# Altium PCB fligt_control_card.PcbDoc (part 2 of 3)
Units mil, origin at the board's own origin, x right, y up, seen from the top; angles counter-clockwise.
Board outline 2510.03 x 2930.03 mil, 4 copper layers (Top Layer, LY_1, LY_2, Bottom Layer), stack 62.677 mil thick; 107 components, 79 nets, 361 pads, 454 vias.
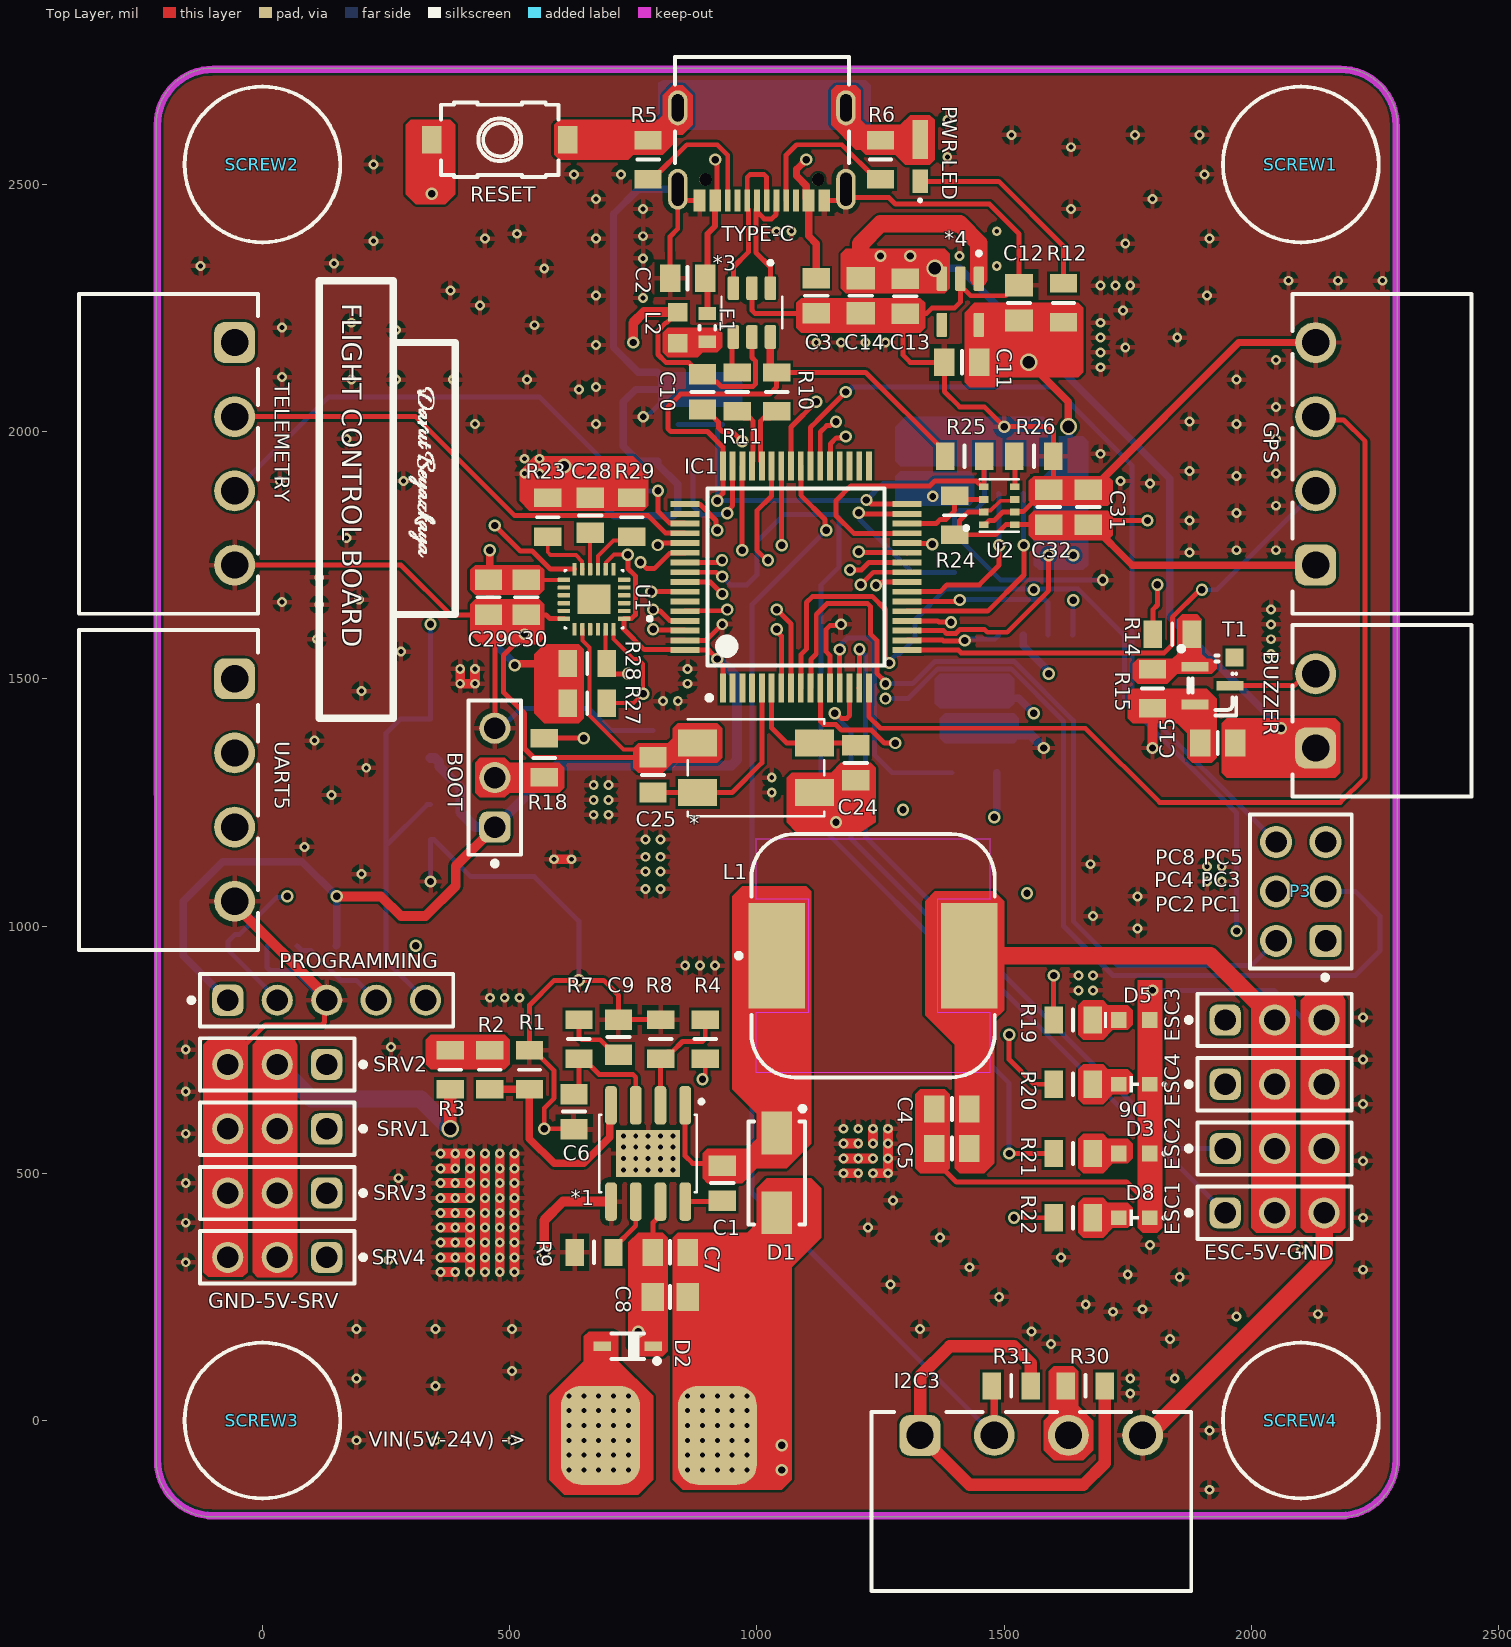
[diagram p0: Top Layer view]

## Via types
v1: diameter 20, hole 10, Top Layer to Bottom Layer, tented both sides, 351 vias
v2: diameter 25, hole 15, Top Layer to Bottom Layer, tented both sides, 89 vias
v3: diameter 23.62, hole 13.78, Top Layer to Bottom Layer, tented both sides, 8 vias
v4: diameter 35, hole 25, Top Layer to Bottom Layer, tented both sides, 4 vias
v5: diameter 25, hole 15, Top Layer to LY_2, tented both sides, 1 vias
v6: diameter 30, hole 20, Top Layer to Bottom Layer, tented both sides, 1 vias

## Nets (pads, with @x,y where several pads share a name; then routed paths per layer and width w, separated by ;. In a path a pad name is that pad's centre, name@x,y a point inside that pad or via, vN(x,y) a via of type N, cw(c..) or ccw(c..) an arc to the next point about the centre after c; other vN are vias at no path point) (continued)
+3.3V_DC: (continued)
  Top Layer w15: C29.2@457.01,1700.2 460,1703.19 v2(460,1760) ; v2(510,1527.5) 512.7,1527.5 515.2,1530 616.93,1530 R28.1@617.64,1530.71 ; R10.1@1027.4,2131.97 *3.6@1027.4,2191.18 ; v4(1550,2140) 1630,2060 v4(1630,2010) ; C31.2@1676.89,1811.61 1758.5,1730 GPS.1@2130,1730
  Top Layer w20: v2(150,1060) 240,1060 280,1020 330,1020 391.02,1081.03 391.02,1121.03 BOOT.1@470,1200
  Top Layer w25: R31.2@1553.74,70 1553.74,116.26 1520,150 1390,150 1330,90 I2C3.1@1330,-30 1430,-130 1660,-130 1703.74,-86.26 R30.2@1703.74,70
  LY_1 w10: v2(460,1760) 505,1805 796.82,1805 822.08,1779.74 822.08,1745.86 816.22,1740 791.82,1740 771.82,1760 751.98,1760 743.02,1751.04 v2(738.96,1751.04)
  LY_1 w15: v2(1480,1220) 1535,1275 1535,1416.11 1532.5,1418.61 1532.5,1441.39 1535,1443.89 1535,1455 v2(1590,1510)
  LY_1 w25: TELEMETRY.1@-56.14,2180 -59.34,2176.8 -120.34,2176.8 -170,2127.14 -170,1870.5 -118.66,1819.16 -118.66,1562.52 UART5.1@-56.14,1500 -59.34,1496.81 -120.34,1496.81 -170,1447.14 -170,1198.57 -132.52,1161.09 -132.52,912.52 PROGRAMMING.1@-70,850 -131,850 -187.5,793.5 -187.5,313.46 -114.04,240 995.96,240 1265.8,-29.84 1329.84,-29.84 I2C3.1@1330,-30
  LY_2 w10: v2(738.96,1751.04) 739.31,1751.04 848.27,1860 v2(920,1860) ; v3(1355.63,1868.93) 1741.07,1868.93 v3(1790,1820)
  LY_2 w15: v2(1560,1430) 1560,1480 v2(1590,1510) 1590,1421.11 1552.5,1383.61 1552.5,1348.61 2031.11,870 2221.21,870 2230,878.79 2230,1630 GPS.1@2130,1730 1660,1730 v2(1640,1750)
  Bottom Layer w10: C21.2@840,2014.57 C16.2@930,2014.57 920,2004.57 v2(920,1860) 920.76,1860.76 1220.76,1860.76 v2(1221.52,1861.53) 1254.57,1894.57 C18.2@1320,1894.57
  Bottom Layer w15: PROGRAMMING.1@-70,850 -160,940 -160,1050 -80,1130 80,1130 v2(150,1060) 150,961.26 R16.1@148.74,960 ; v2(460,1760) 460,1580 510,1530 v2(510,1527.5) ; v2(1480,1220) 1480,1224.06 1485.08,1229.14 L3.1@1485.08,1310 ; C22.2@1480,1475.43 1495.14,1460.3 1529.7,1460.3 v2(1560,1430) ; *5.3@1538.34,1588.39 1538.34,1567.13 1588.35,1517.12 1588.35,1511.65 v2(1590,1510) ; *5.7@1588.34,1875 *5.7@1589.17,1874.17 ; v4(1630,2010) 1631.91,2008.09 1631.91,1963.52 C33.2@1635.43,1960 ; *5.8@1638.34,1875 *5.8@1639.17,1874.17
  Bottom Layer w20: R13.2@340,1340 348.86,1340 357.56,1331.3 357.56,1322.44 400,1280 400,1230 429.36,1200.64 469.36,1200.64 BOOT.1@470,1200 594.57,1324.57 C17.2@790,1324.57 948.28,1324.57 960,1336.28 960,1503.62 937.08,1526.54 934.81,1526.54 921.35,1540 v2(920,1540)
+5V_DC: *3.5 *4.1 *4.3 BUZZER.1 C4.2 C5.2 C10.1 C13.2 C14.2 C15.2 ESC1.2 ESC2.2 ESC3.2 ESC4.2 L1.2 L2.2 R3.2 SRV1.2 SRV2.2 SRV3.2 SRV4.2 | length 6865.4
  Top Layer w10: L2.2@840,2241.5 839.01,2241.5 817.52,2220 815.86,2220 800,2204.14 800,2155.86 815.86,2140 861.58,2140 867.44,2134.14 867.44,2131.1 879.46,2119.08 899.88,2119.08 899.88,2112.44 912.56,2099.76 919.2,2099.76 928.3,2090.67 991.7,2090.67 997.56,2096.53 997.56,2142.21 990,2149.77 *3.5@990,2191.18
  Top Layer w20: v2(750,2180) 750,2220 771.49,2241.5 L2.2@839.01,2241.5
  Top Layer w25: v4(380,590) R3.2@380,670
  Top Layer w35: C14.2@1210,2310 1210,2380 1250,2420 1410,2420 1448.9,2381.1 *4.1@1448.9,2309.02 ; L1.2@1429.76,940 1917.05,940 ESC3.2@2047.05,810
  LY_1 w35: v4(380,590) 430,640 1570,640 1930,280 1990,280 2053.79,343.79 2053.79,413.26 ESC1.2@2047.05,420 ; ESC3.2@2047.05,810 2137.05,900 2225.35,900 2250,924.64 2250,1240 BUZZER.1@2130,1360
  LY_2 w25: v2(750,2180) 900,2180 1140,2420 1345.35,2420 1360,2405.36 v4(1360,2330)
  Bottom Layer w15: v4(1360,2330) 1410,2330 1835,1905 1835,1625 v2(2060,1400)
  Bottom Layer w35: SRV2.2@30,720 100,650 320,650 v4(380,590)
  other v2: 1250,2355 1310,2355
BOOT0: IC1.60 R18.2 | length 698.6
  Top Layer w10: R18.2@570,1379.37 570.63,1380 v2(650,1380) ; IC1.60@854.49,1636.69 855.39,1637.6 937.6,1637.6 v2(940,1640)
  LY_1 w10: v2(650,1380) 880,1380 960,1460 960,1620 v2(940,1640)
BUZZER_MCU: IC1.58 R14.1 | length 1740.9
  Top Layer w10: v2(786.26,1676.26) 786.46,1676.06 IC1.58@854.49,1676.06 ; R14.1@1800.63,1590 1800.63,1639.78 1810,1649.15 v2(1810,1690)
  LY_1 w10: v2(786.26,1676.26) 840,1730 840,2000 990,2150 1280,2150 1740,1690 v2(1810,1690)
ESC_PWM_1: ESC1.1 IC1.14 | length 1429.4
  Top Layer w10: v2(1157.5,1430.06) 1160.8,1430.06 1170.86,1420 1181.82,1420 1187.68,1425.86 1187.68,1480.67 IC1.14@1187.16,1481.18
  Bottom Layer w10: v2(1157.5,1430.06) 1157.5,1426 1190,1393.5 1190,1177.05 ESC1.1@1947.05,420
ESC_PWM_2: ESC2.1 IC1.15 | length 1452.5
  Top Layer w10: IC1.15@1206.85,1481.18 1207.75,1482.09 1207.75,1559.74 v2(1207.5,1560)
  Bottom Layer w10: v2(1207.5,1560) 1207.5,1559.14 1220,1546.64 1220,1180 1850,550 ESC2.1@1947.05,550
ESC_PWM_3: ESC3.1 IC1.42 | length 2013.4
  Top Layer w10: IC1.42@1049.37,1930 1049.68,1929.69 1049.68,1770.1 v2(1050,1769.79)
  LY_1 w10: v2(1050,1769.79) 1050.21,1769.79 1108.19,1711.81 1108.19,871.81 1250,730 1867.05,730 ESC3.1@1947.05,810
ESC_PWM_4: ESC4.1 IC1.43 | length 2070.2
  Top Layer w10: v2(1022.5,1740) 1020,1740 1000,1760 1000,1840 1029.68,1869.69 IC1.43@1029.68,1930
  LY_1 w10: v2(1022.5,1740) 1022.5,1737.5 1080,1680 1080,840 1240,680 ESC4.1@1947.05,680
FB: *1.4 R1.2 R2.1 | length 450.9
  Top Layer w15: R2.1@460,670 R1.2@540,670 540,570 590,520 650,520 702.54,572.54 702.54,634.98 *1.4@705,637.44